# Altium PCB PCB1.pcbdoc (part 2 of 2)
Units mil, origin at the board's own origin, x right, y up, seen from the top; angles counter-clockwise.
Board outline 1771.65 x 1825.33 mil, 2 copper layers (Top Layer, Bottom Layer), stack 62.206 mil thick; 72 components, 46 nets, 229 pads, 305 vias.
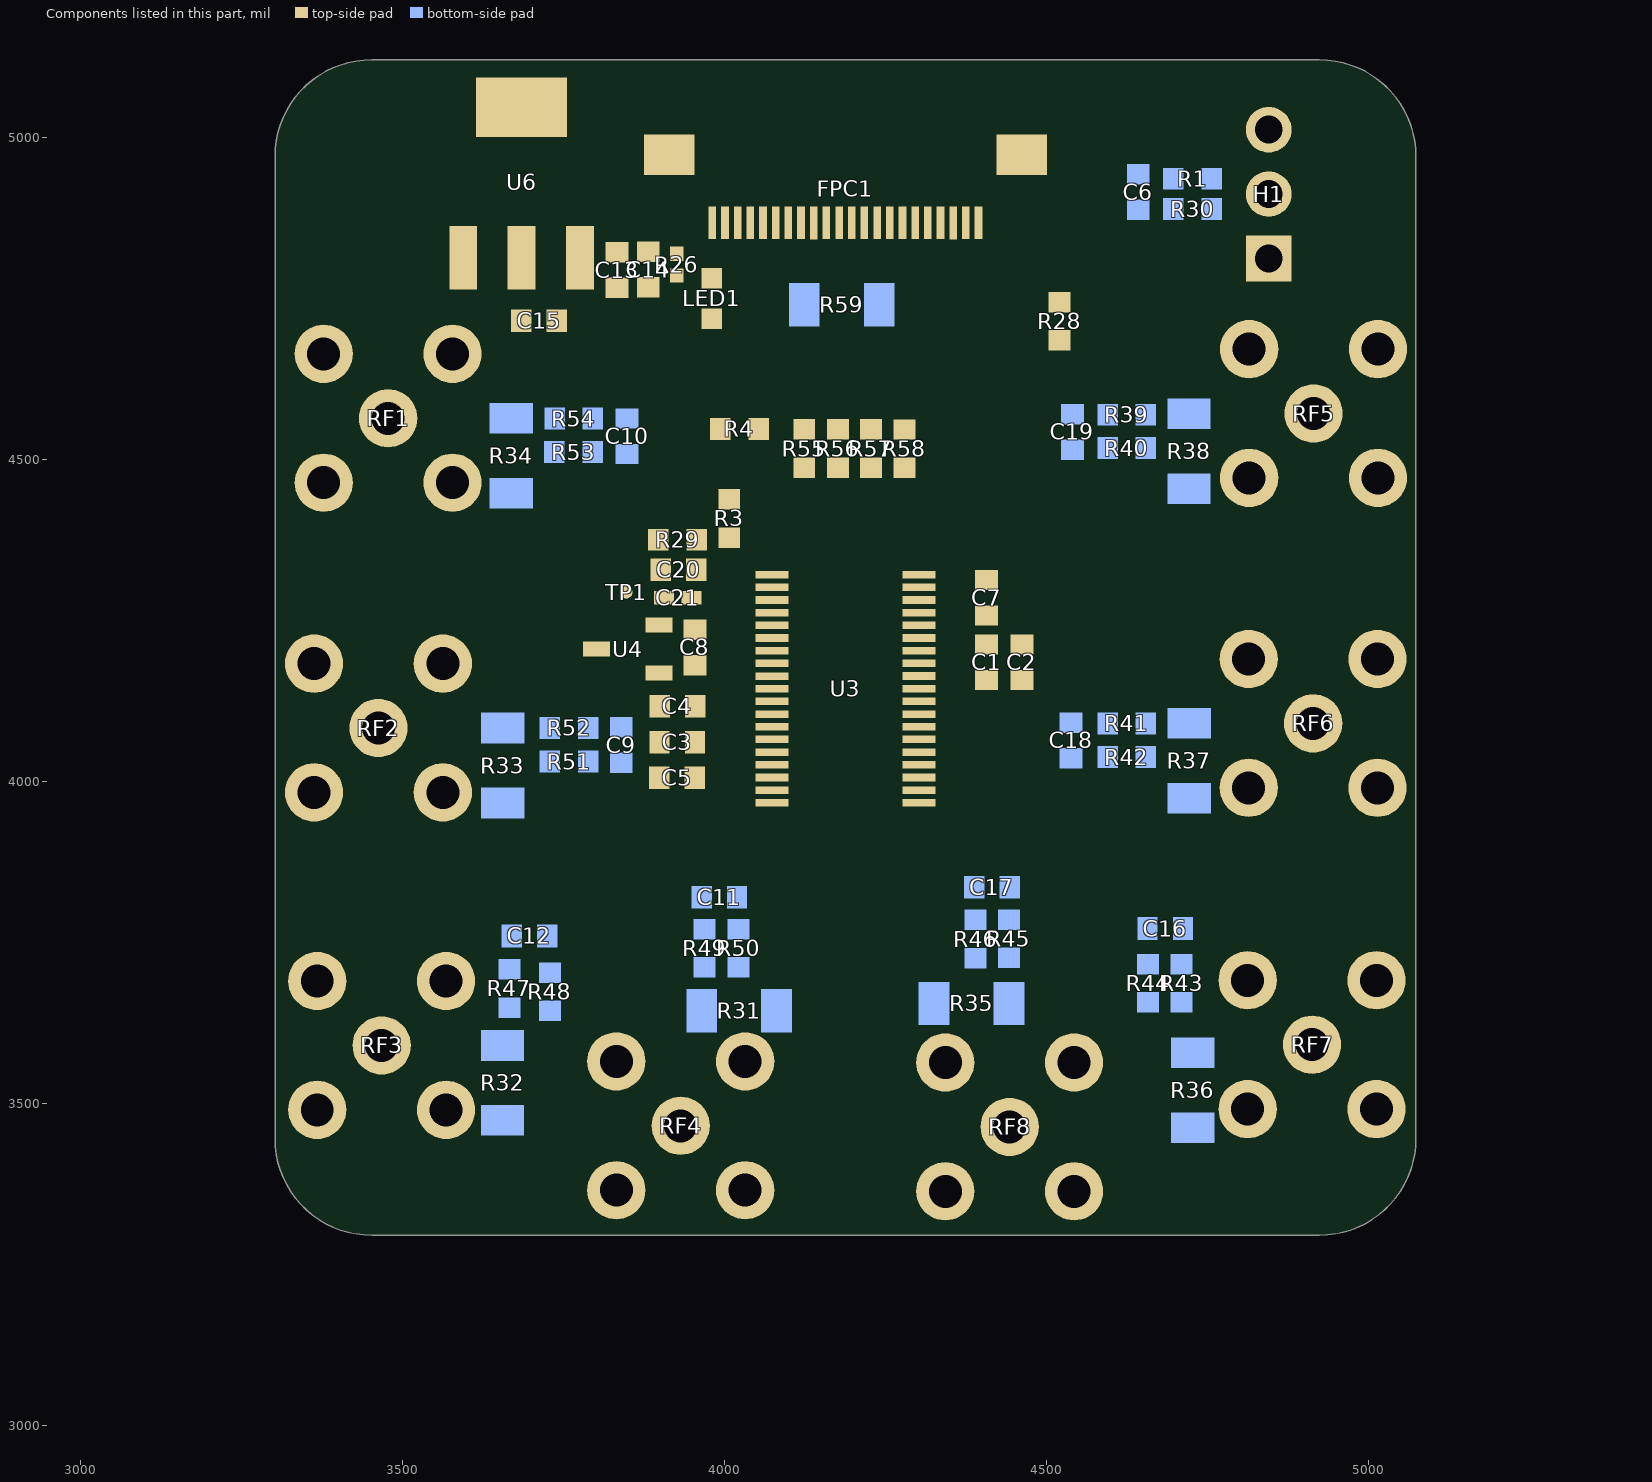
[diagram p2: the components of this part, seen from the top]

## Other copper (continued)
Bottom Layer:
  region net $1N11929: 4621.6,4901.16 4628.74,4908.17 ccw(c4644.65,4929.38) 4644.65,4902.86 4625,4887.15 ccw(c4594.43,4887.15)
  region net $1N11847: 4628.74,4921.18 4621.64,4928.23 ccw(c4594.3,4942.2) 4625,4942.2 4644.65,4926.49 ccw(c4644.65,4899.97)
  region net $1N2508: 3872.77,4088.48 3872.77,4078.48 ccw(c3872.77,4059.73) 3857.77,4070.98 3857.77,4095.98 ccw(c3872.77,4107.23)
  region net $1N2515: 3872.77,4033.36 3872.77,4023.36 ccw(c3872.77,4004.61) 3857.77,4015.86 3857.77,4040.86 ccw(c3872.77,4052.11)
  region net $1N2496: 3872.01,4542.7 3858.57,4542 ccw(c3842.66,4520.79) 3842.66,4547.3 3866.71,4558.61 ccw(c3893.23,4558.61)
  region net $1N2502: 3872.01,4491.98 3862.97,4486.88 ccw(c3847.06,4465.67) 3847.06,4492.18 3866.71,4507.89 ccw(c3893.23,4507.89)
  region net $1N2534: 3975.1,3852.41 3985.1,3852.41 ccw(c4007.52,3837.41) 3980.55,3837.41 3967.6,3837.41 ccw(c3956.35,3852.41)
  region net $1N2549: 4019.61,3852.41 4029.61,3852.41 ccw(c4051.2,3852.41) 4035.67,3837.41 4012.11,3837.41 ccw(c4000.86,3852.41)
  region net $1N2525: 3664.8,3792.41 3674.8,3792.41 ccw(c3693.55,3792.41) 3682.3,3777.41 3657.3,3777.41 ccw(c3646.05,3792.41)
  region net $1N2541: 3755.67,3764.69 3755.67,3754.69 ccw(c3755.67,3735.94) 3740.67,3747.19 3740.67,3772.19 ccw(c3755.67,3783.44)
  region net $1N3142: 4636.23,3770.32 4626.27,3794.42 ccw(c4640.37,3808.52) 4641.53,3788.61 4641.53,3754.41 ccw(c4615.01,3754.41)
  region net $1N3136: 4687.95,3801.13 4706.72,3796.51 ccw(c4728.8,3818.58) 4720.04,3788.61 4696.65,3788.61 ccw(c4657.51,3770.68)
  region net $1N3155: 4382.99,3867.85 4392.99,3867.85 ccw(c4411.74,3867.85) 4400.49,3852.85 4375.49,3852.85 ccw(c4364.24,3867.85)
  region net $1N3148: 4438.53,3867.85 4448.53,3867.85 ccw(c4467.28,3867.85) 4456.03,3852.85 4431.03,3852.85 ccw(c4419.78,3867.85)
  region net $1N17239: 4505.89,4035.09 4505.89,4045.09 ccw(c4505.89,4066.18) 4520.89,4051.36 4520.89,4027.59 ccw(c4505.89,4016.34)
  region net $1N17244: 4505.89,4070.09 4505.89,4080.09 ccw(c4505.89,4098.84) 4520.89,4087.59 4520.89,4074.98 ccw(c4520.89,4049.53)
  region net $1N3111: 4545.63,4483.8 4535.63,4483.8 ccw(c4516.88,4483.8) 4528.13,4498.8 4553.13,4498.8 ccw(c4564.38,4483.8)
  region net $1N3102: 4512.34,4564.67 4512.34,4574.67 ccw(c4512.34,4585.88) 4522.92,4582.17 4522.92,4557.17 ccw(c4512.34,4553.46)
  region net AUX: 4803.6,4844.83 4812.09,4853.31 ccw(c4831.18,4878.77) 4831.18,4846.95 4809.96,4825.74 ccw(c4778.14,4825.74)
  region net AUX: 4779.21,4886.19 4787.73,4860.7 ccw(c4752.44,4825.41) 4772.63,4871.05 4772.63,4905.07 ccw(c4802.99,4905.07)
  region net $1N3616: 3975.64,3591.86 3963.64,3591.86 ccw(c3941.14,3591.86) 3954.64,3609.86 3984.64,3609.86 ccw(c3998.14,3591.86)
  region net $1N3593: 3604.36,3583.52 3604.36,3595.52 ccw(c3604.36,3618.02) 3622.36,3604.52 3622.36,3574.52 ccw(c3604.36,3561.02)
  region net $1N3571: 3604.48,4076.44 3604.48,4088.44 ccw(c3604.48,4110.94) 3622.48,4097.44 3622.48,4067.44 ccw(c3604.48,4053.94)
  region net $1N3547: 3617.74,4557.39 3617.74,4569.39 ccw(c3617.74,4591.89) 3635.74,4578.39 3635.74,4548.39 ccw(c3617.74,4534.89)
  region net $1N20017: 4450.19,3603.42 4438.19,3603.42 ccw(c4415.69,3603.42) 4429.19,3621.42 4459.19,3621.42 ccw(c4472.69,3603.42)
  region net $1N17152: 4775.85,3595.69 4775.85,3585.69 ccw(c4775.85,3566.94) 4760.85,3578.19 4760.85,3601.68 ccw(c4775.85,3617.46)
  region net $1N16947: 4773.47,4095.53 4773.47,4083.53 ccw(c4773.47,4061.03) 4755.47,4074.53 4755.47,4104.53 ccw(c4773.47,4118.03)
  region net $1N16896: 4773.29,4576.78 4773.29,4564.78 ccw(c4773.29,4542.28) 4755.29,4555.78 4755.29,4585.78 ccw(c4773.29,4599.28)
  region net $1N3547: 3539.63,4569.39 3539.63,4557.39 3537.62,4557.15 3535.56,4556.48 3533.46,4555.41 3531.34,4554.01 3529.19,4552.32 3527.05,4550.39 3522.79,4546.03 3518.66,4541.35 3514.75,4536.75 3511.14,4532.64 3507.94,4529.44 3507.94,4597.35 3511.14,4594.14 3514.75,4590.03 3518.66,4585.43 3522.79,4580.75 3527.05,4576.39 3529.19,4574.47 3531.34,4572.78 3533.46,4571.37 3535.56,4570.31 3537.62,4569.63
  region net $1N3571: 3524.63,4088.44 3524.63,4076.44 3522.62,4076.2 3520.56,4075.52 3518.46,4074.45 3516.34,4073.05 3514.19,4071.36 3512.05,4069.43 3507.79,4065.08 3503.66,4060.4 3499.75,4055.8 3496.14,4051.69 3492.94,4048.48 3492.94,4116.39 3496.14,4113.18 3499.75,4109.08 3503.66,4104.48 3507.79,4099.79 3512.05,4095.44 3514.19,4093.51 3516.34,4091.82 3518.46,4090.42 3520.56,4089.35 3522.62,4088.67
  region net $1N3593: 3529.61,3595.52 3529.65,3583.52 3525.99,3583.36 3522.87,3582.89 3520.24,3582.14 3518.01,3581.12 3516.13,3579.85 3514.51,3578.36 3513.1,3576.66 3511.82,3574.78 3509.37,3570.55 3506.62,3565.82 3504.95,3563.33 3503,3560.77 3500.69,3558.17 3497.96,3555.55 3497.92,3623.47 3501.13,3620.26 3504.73,3616.15 3508.65,3611.55 3512.78,3606.87 3517.03,3602.52 3519.18,3600.59 3521.32,3598.9 3523.44,3597.5 3525.54,3596.43 3527.6,3595.76
  region net $1N3616: 3963.64,3541.34 3975.64,3485.42 3975.76,3481.93 3976.03,3478.02 3976.74,3469.47 3977,3465.14 3977.06,3460.98 3976.86,3457.12 3976.29,3453.72 3937.75,3509.64 3940.89,3509.47 3943.82,3509.7 3946.56,3510.31 3949.09,3511.28 3951.41,3512.57 3953.54,3514.17 3955.46,3516.05 3957.18,3518.19 3958.69,3520.55 3960.01,3523.12 3961.12,3525.86 3962.03,3528.75 3962.73,3531.77 3963.24,3534.9 3963.54,3538.09
  region net $1N3616: 3963.64,3541.34 3975.64,3480.11 3975.81,3475.14 3976.21,3470.94 3977.08,3463.9 3977.23,3460.57 3976.97,3457.04 3976.15,3453.07 3974.61,3448.42 3937.75,3509.64 3940.89,3509.47 3943.82,3509.7 3946.56,3510.31 3949.09,3511.28 3951.41,3512.57 3953.54,3514.17 3955.46,3516.05 3957.18,3518.19 3958.69,3520.55 3960.01,3523.12 3961.12,3525.86 3962.03,3528.75 3962.73,3531.77 3963.24,3534.9 3963.54,3538.09
  region net $1N16896: 4853.39,4564.78 4853.39,4576.78 4855.4,4577.02 4857.46,4577.7 4859.56,4578.76 4861.68,4580.17 4863.82,4581.86 4865.97,4583.78 4870.22,4588.14 4874.36,4592.82 4878.27,4597.42 4881.88,4601.53 4885.08,4604.74 4885.08,4536.82 4881.88,4540.03 4878.27,4544.14 4874.36,4548.74 4870.22,4553.42 4865.97,4557.78 4863.82,4559.7 4861.68,4561.4 4859.56,4562.8 4857.46,4563.87 4855.4,4564.54
  region net $1N16947: 4852.74,4083.53 4852.68,4095.53 4856.34,4095.69 4859.46,4096.15 4862.09,4096.91 4864.32,4097.93 4866.2,4099.2 4867.82,4100.69 4869.23,4102.39 4870.51,4104.27 4872.96,4108.5 4875.71,4113.23 4877.38,4115.72 4879.33,4118.28 4881.64,4120.88 4884.37,4123.5 4884.43,4055.58 4881.23,4058.79 4877.62,4062.9 4873.7,4067.49 4869.57,4072.17 4865.32,4076.53 4863.18,4078.45 4861.03,4080.14 4858.91,4081.55 4856.81,4082.61 4854.75,4083.29
  region net $1N17152: 4851.1,3585.69 4851.1,3595.69 4853.17,3595.93 4855.26,3596.64 4857.38,3597.74 4859.51,3599.2 4861.64,3600.95 4863.77,3602.94 4867.97,3607.45 4872.04,3612.3 4875.91,3617.07 4879.52,3621.32 4882.79,3624.65 4882.79,3556.73 4879.52,3560.05 4875.91,3564.31 4872.04,3569.08 4867.97,3573.92 4863.77,3578.44 4861.64,3580.43 4859.51,3582.18 4857.38,3583.64 4855.26,3584.74 4853.17,3585.44
  region net $1N20017: 4438.19,3525.4 4450.19,3523.85 4450.42,3521.82 4451.09,3519.75 4452.14,3517.65 4453.53,3515.53 4455.2,3513.4 4457.1,3511.27 4461.4,3507.06 4466.02,3502.96 4470.56,3499.06 4474.62,3495.43 4477.79,3492.16 4409.89,3493.7 4412.54,3496.36 4415.17,3498.61 4417.76,3500.53 4420.28,3502.19 4425.06,3504.97 4429.35,3507.48 4431.25,3508.8 4432.97,3510.24 4434.48,3511.89 4435.76,3513.8 4436.79,3516.04 4437.55,3518.68 4438.03,3521.77
  region net $1N2508: 3987.27,4077.72 3994.34,4084.79 3995.2,4084.05 3996.19,4083.42 3998.39,4082.5 4000.77,4081.94 4003.11,4081.68 3990.38,4068.94 3990.11,4071.28 3989.55,4073.66 3988.63,4075.87 3988.01,4076.85
  region net $1N11847: 4164.59,4255.33 4174.59,4255.33 4174.68,4254.2 4174.93,4253.06 4175.84,4250.85 4177.12,4248.77 4178.59,4246.93 4160.58,4246.93 4162.05,4248.77 4163.34,4250.85 4164.24,4253.06 4164.5,4254.2
  region net $1N2534: 3985.1,3869.51 3975.1,3869.51 3975.01,3870.65 3974.76,3871.78 3973.85,3874 3972.57,3876.07 3971.1,3877.92 3989.11,3877.92 3987.64,3876.07 3986.36,3874 3985.45,3871.78 3985.19,3870.65
  region net $1N2549: 4029.61,3846.49 4019.61,3850.62 4019.36,3852.83 4018.72,3854.96 4017.81,3857.02 4016.77,3859.02 4034.31,3854.9 4032.58,3853.28 4031.08,3851.15 4030.01,3848.78 4029.71,3847.61
  region net $1N3155: 4365.51,3915.3 4358.44,3908.23 4357.57,3908.97 4356.59,3909.59 4354.38,3910.52 4352.01,3911.08 4349.66,3911.34 4362.4,3924.08 4362.66,3921.73 4363.22,3919.36 4364.14,3917.15 4364.77,3916.17
  region net $1N3148: 4448.53,3869.73 4438.53,3869.73 4438.44,3870.86 4438.19,3872 4437.28,3874.21 4436,3876.29 4434.53,3878.13 4452.54,3878.13 4451.07,3876.29 4449.79,3874.21 4448.88,3872 4448.62,3870.86
  region net $1N3142: 4637.83,3782.86 4630.76,3775.79 4629.89,3776.53 4628.91,3777.15 4626.7,3778.08 4624.33,3778.64 4621.98,3778.9 4634.72,3791.64 4634.99,3789.29 4635.54,3786.92 4636.47,3784.71 4637.09,3783.73
  region net $1N3136: 4700.59,3802.63 4693.52,3795.56 4692.65,3796.3 4691.67,3796.92 4689.46,3797.84 4687.09,3798.4 4684.75,3798.67 4697.48,3811.4 4697.75,3809.06 4698.31,3806.69 4699.23,3804.48 4699.85,3803.5
  region net $1N17244: 4487.02,4080.09 4487.02,4070.09 4485.89,4070 4484.75,4069.75 4482.54,4068.84 4480.46,4067.56 4478.62,4066.09 4478.62,4084.1 4480.46,4082.63 4482.54,4081.35 4484.75,4080.44 4485.89,4080.18
  region net $1N17239: 4502.02,4045.09 4502.02,4035.09 4500.89,4035 4499.75,4034.75 4497.54,4033.84 4495.46,4032.56 4493.62,4031.09 4493.62,4049.1 4495.46,4047.63 4497.54,4046.35 4499.75,4045.44 4500.89,4045.18
  region net $1N2515: 4106.34,4029.96 4099.26,4037.03 4100,4037.9 4100.63,4038.88 4101.55,4041.09 4102.11,4043.46 4102.38,4045.81 4115.11,4033.07 4112.77,4032.81 4110.39,4032.25 4108.18,4031.32 4107.2,4030.7
  region net $1N2525: 3861.01,3929.69 3861.01,3939.69 3862.15,3939.78 3863.28,3940.04 3865.5,3940.94 3867.57,3942.23 3869.42,3943.7 3869.42,3925.69 3867.57,3927.16 3865.5,3928.44 3863.28,3929.35 3862.15,3929.6
  region net $1N2541: 3889.34,3859.6 3882.27,3866.67 3883.01,3867.53 3883.63,3868.52 3884.55,3870.72 3885.11,3873.1 3885.38,3875.44 3898.11,3862.71 3895.77,3862.44 3893.39,3861.88 3891.19,3860.96 3890.2,3860.34
  region net $1N2502: 3997.27,4107.72 4004.34,4114.79 4005.2,4114.05 4006.19,4113.42 4008.39,4112.5 4010.77,4111.94 4013.11,4111.68 4000.38,4098.94 4000.11,4101.28 3999.55,4103.66 3998.63,4105.87 3998.01,4106.85
  region net $1N3102: 4360.39,4129.79 4367.46,4122.72 4366.72,4121.85 4366.09,4120.87 4365.17,4118.66 4364.61,4116.28 4364.35,4113.94 4351.61,4126.68 4353.95,4126.94 4356.33,4127.5 4358.54,4128.42 4359.52,4129.05
  region net $1N3111: 4415.39,4129.79 4422.46,4122.72 4421.72,4121.85 4421.09,4120.87 4420.17,4118.66 4419.61,4116.28 4419.35,4113.94 4406.61,4126.68 4408.95,4126.94 4411.33,4127.5 4413.54,4128.42 4414.52,4129.05
  region net 5V_USB: 4138.71,4171.42 4138.71,4161.42 4137.57,4161.33 4136.44,4161.07 4134.22,4160.17 4132.15,4158.88 4130.3,4157.41 4130.3,4175.42 4132.15,4173.95 4134.22,4172.67 4136.44,4171.76 4137.57,4171.51
  region net 5V_USB: 4107.2,4173.95 4113.85,4181.44 4114.72,4180.7 4115.71,4180.08 4117.95,4179.16 4120.36,4178.63 4122.72,4178.42 4110.41,4165.27 4110.09,4167.6 4109.5,4169.94 4108.57,4172.11 4107.94,4173.08
  region net 5V_USB: 4238.77,4161.42 4233.86,4171.42 4234.97,4171.53 4236.15,4171.83 4238.55,4172.91 4240.7,4174.44 4241.58,4175.3 4242.26,4176.19 4247.17,4158.86 4245.15,4159.8 4243.08,4160.62 4240.96,4161.2
  region net 3.3V: 4254.34,4224.6 4247.27,4231.67 4248.01,4232.53 4248.63,4233.52 4249.55,4235.72 4250.11,4238.1 4250.38,4240.44 4263.11,4227.71 4260.77,4227.44 4258.39,4226.88 4256.19,4225.96 4255.2,4225.34
  region net 5V_USB: 3954.8,4832.28 3947.73,4825.21 3946.86,4825.95 3945.88,4826.58 3943.67,4827.5 3941.3,4828.06 3938.96,4828.32 3951.69,4841.06 3951.96,4838.72 3952.52,4836.34 3953.44,4834.13 3954.06,4833.15
  region net 5V_USB: 3931.68,4825.21 3924.61,4832.28 3925.35,4833.15 3925.98,4834.13 3926.9,4836.34 3927.46,4838.72 3927.72,4841.06 3940.46,4828.32 3938.11,4828.06 3935.74,4827.5 3933.53,4826.58 3932.55,4825.95
  region net 5V_USB: 3783.61,4353.44 3793.61,4353.44 3793.7,4352.33 3793.96,4351.26 3794.86,4349.25 3796.15,4347.39 3797.62,4345.64 3779.61,4345.64 3781.08,4347.39 3782.36,4349.25 3783.27,4351.26 3783.52,4352.33

## Silkscreen, mask and mechanical layers (free items; w line width, h text height)
Bottom Silkscreen Layer:
  lines w10: 3317.36,3474.69 3517.36,3474.69 3517.36,3844.69 3317.36,3844.69 3317.36,3474.69 ; 3317.36,3964.69 3512.36,3964.69 3512.36,4344.69 3317.36,4344.69 3317.36,3964.69 ; 3317.36,4444.69 3512.36,4444.69 3512.36,4809.69 3317.36,4809.69 3317.36,4444.69 ; 3627.36,3309.69 4052.36,3309.69 4052.36,3424.69 3627.36,3424.69 3627.36,3309.69 ; 4112.36,3309.69 4562.36,3309.69 4562.36,3429.69 4112.36,3429.69 4112.36,3309.69 ; 4877.36,4459.69 5057.36,4459.69 5057.36,4769.69 4877.36,4769.69 4877.36,4459.69 ; 4887.36,3474.69 5072.91,3474.69 5072.91,3850.36 4887.36,3850.36 4887.36,3474.69 ; 4887.36,3970.36 5072.91,3970.36 5072.91,4344.69 4887.36,4344.69 4887.36,3970.36
  text "AGND" at 5067.36,4914.69 h78.74
  text "3.3V" at 5057.36,4849.69 h78.74
  text "墨藤" at 3872.36,4799.69 h120
  text "AUX" at 5062.36,4784.69 h78.74
  text "IN6" at 3497.36,4694.69 h120
  text "IN5" at 4992.36,4689.69 h78.74
  text "IN7" at 3497.36,4224.69 h120
  text "IN4" at 5057.36,4224.69 h120
  text "IN3" at 5057.36,3729.69 h120
  text "IN0" at 3492.36,3724.69 h120
  text "IN1" at 3767.36,3304.69 h120
  text "IN2" at 4277.36,3304.69 h120

## Dimensions
3302.36,2804.69 to 5072.36,2804.69 on Document Layer
5722.36,3294.69 to 5722.36,5119.69 on Document Layer